# Altium PCB MainBoardPCB.PcbDoc (part 18 of 50)
Units mm, origin at the board's own origin, x right, y up, seen from the top; angles counter-clockwise.
Board outline 258.95 x 308.86 mm, 16 copper layers (L1, L2 (GND), L3 (Sign), L4 (GND), L5 (Sign), L6 (PWR/GND), L7(12V+Other), L8 (Plane_GND), L9 (PWR/GND), L10 (3V3+Other), L11 (PWR/GND), L12 (Sign), L13 (GND), L14 (Sign), L15 (GND), L16), stack 2.503 mm thick; 2578 components, 1867 nets, 8817 pads, 8021 vias.
Unrouted connection lines stored in the file: 25.
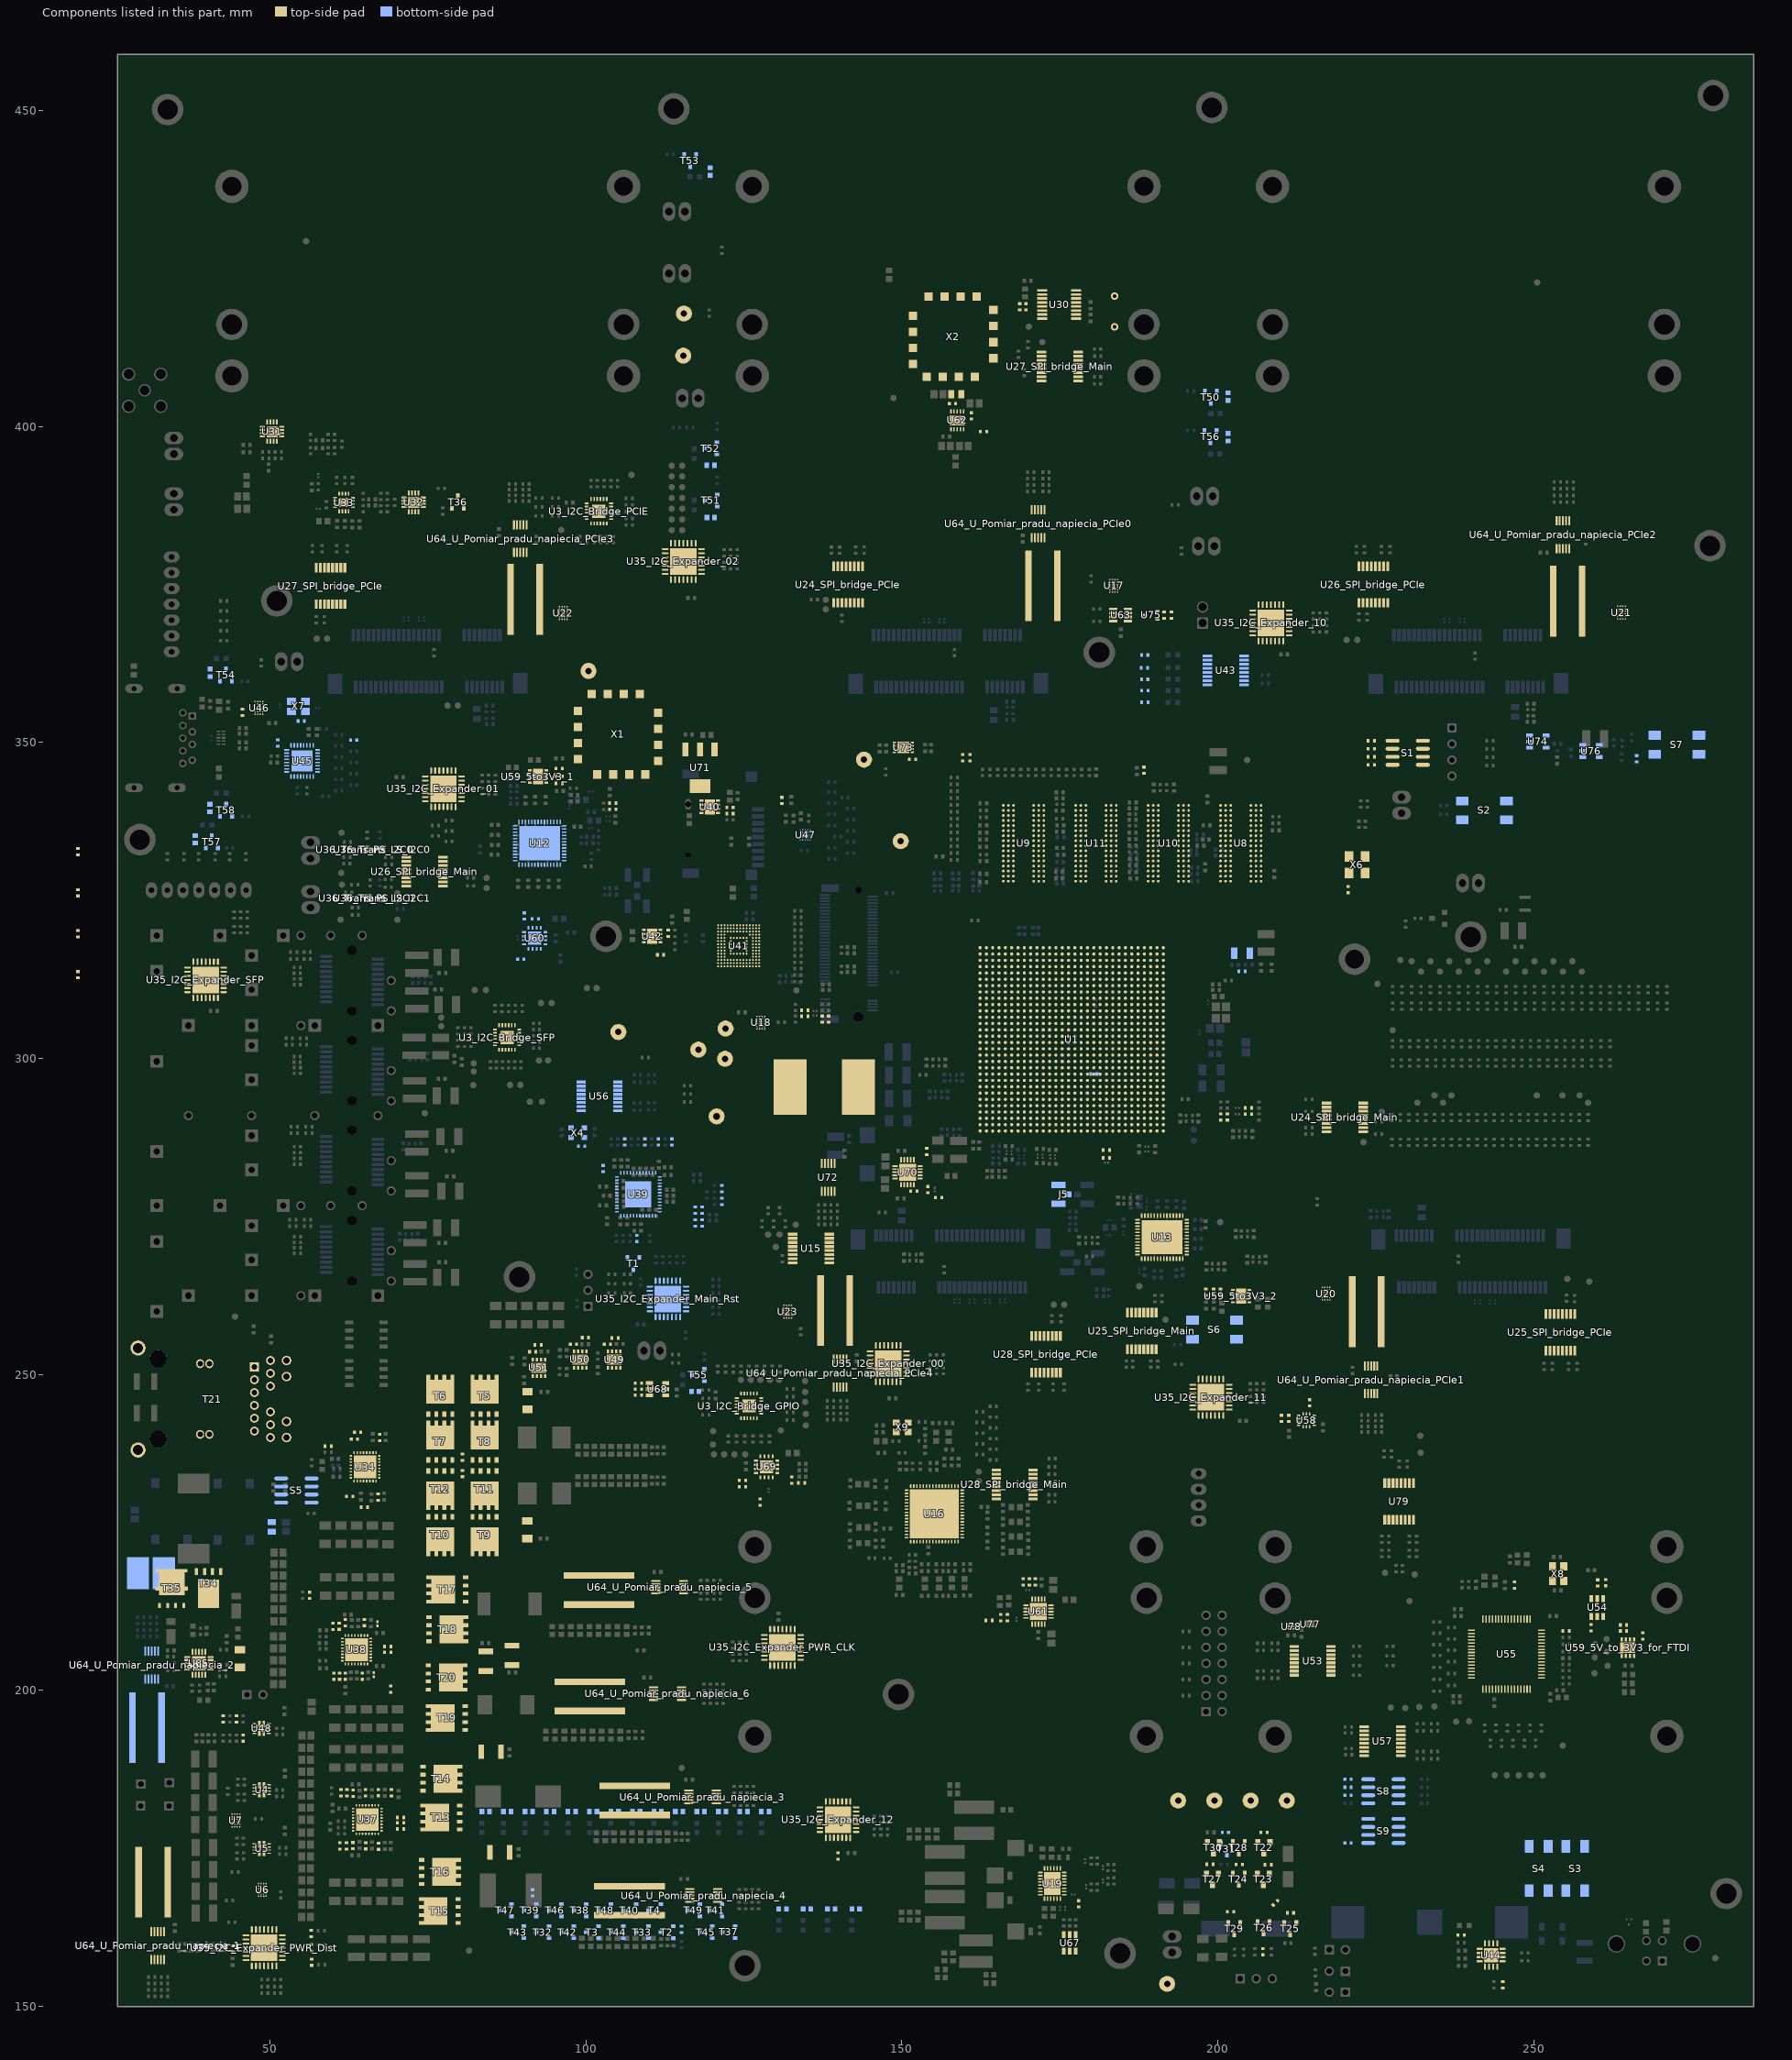
[diagram p23: the components of this part, seen from the top]

## Part data (continued)
R1059 R1089: library part Resistor, Case Code (Imperial)=0402, Case Code (Metric)=1005, Manufacturer=Panasonic, Manufacturer Part Number=ERJ-2RKF2002X, Max Operating Temperature=155°C, Max Power Dissipation=100mW, Min Operating Temperature=-55°C, Package Quantity=1, Supplier Part Number 1=P20.0KLCT-ND, Temperature Coefficient=100ppm/°C, Tolerance=1%, Voltage Rating=50V, Case/Package=0402, ComponentLink1Description=https://datasheet.ciiva.com/11821/0900766b80f80784-11821220.pdf?src-supplier=RSComponents, ComponentLink1URL=https://datasheet.ciiva.com/11821/0900766b80f80784-11821220.pdf?src-supplier=RSComponents, ComponentLink2Description=https://datasheet.ciiva.com/16762/70260748-16762885.pdf?src-supplier=Allied+Electronics, ComponentLink2URL=https://datasheet.ciiva.com/16762/70260748-16762885.pdf?src-supplier=Allied+Electronics, ComponentLink3Description=https://datasheet.ciiva.com/16782/70260748-16782455.pdf?src-supplier=Allied+Electronics, ComponentLink3URL=https://datasheet.ciiva.com/16782/70260748-16782455.pdf?src-supplier=Allied+Electronics, ComponentLink4Description=https://datasheet.ciiva.com/48531/aoa0000ce2-48531063.pdf?src-supplier=Avnet, ComponentLink4URL=https://datasheet.ciiva.com/48531/aoa0000ce2-48531063.pdf?src-supplier=Avnet, ComponentLink5Description=https://datasheet.ciiva.com/28688/1678782-28688600.pdf?src-supplier=Element14, ComponentLink5URL=https://datasheet.ciiva.com/28688/1678782-28688600.pdf?src-supplier=Element14, ComponentLink6Description=https://datasheet.ciiva.com/46377/426256-46377368.pdf?src-supplier=Element14, ComponentLink6URL=https://datasheet.ciiva.com/46377/426256-46377368.pdf?src-supplier=Element14, ComponentLink7Description=https://datasheet.ciiva.com/6138/426256-6138761.pdf?src-supplier=Farnell, ComponentLink7URL=https://datasheet.ciiva.com/6138/426256-6138761.pdf?src-supplier=Farnell, ComponentLink8Description=https://datasheet.ciiva.com/24159/aoa0000ce2-24159274.pdf?src-supplier=Mouser, ComponentLink8URL=https://datasheet.ciiva.com/24159/aoa0000ce2-24159274.pdf?src-supplier=Mouser, ComponentLink9Description=https://datasheet.ciiva.com/16508/aoa0000ce2-16508524.pdf?src-supplier=Future+Electronics, ComponentLink9URL=https://datasheet.ciiva.com/16508/aoa0000ce2-16508524.pdf?src-supplier=Future+Electronics, ComponentLink10Description=https://datasheet.ciiva.com/16514/aoa0000ce2-16514269.pdf?src-supplier=Avnet+Asia, ComponentLink10URL=https://datasheet.ciiva.com/16514/aoa0000ce2-16514269.pdf?src-supplier=Avnet+Asia, ComponentLink11Description=https://datasheet.ciiva.com/30049/aoa0000ce2-30049982.pdf?src-supplier=Onlinecomponents.com, ComponentLink11URL=https://datasheet.ciiva.com/30049/aoa0000ce2-30049982.pdf?src-supplier=Onlinecomponents.com, Composition="Thick Film", Contact Plating=Tin, Depth=0.5mm, Features="Automotive AEC-Q200", Height=0.35mm, Lead Free="Lead Free", Length=1mm, Military Standard=Not, Mount="Surface Mount", Number of Terminations=2, Packaging="Cut Tape", Power Rating=100mW, Pricing 1="1 = 0,10000, 10 = 0,05000, 100 = 0,02050, 1000 = 0,00920, 2500 = 0,00798, 5000 = 0,00660 (USD)", Radiation Hardening=No, REACH SVHC="No SVHC", Resistance=20kR, RoHS=Yes, Stock 1=2516725, Supplier 1=Digi-Key, Termination=SMD/SMT, Voltage Rating (DC)=50V, Weight=2.8E-05oz, Width=0.02inch
S1 S5 S8 S9: library part "SW DIP-4", Current Rating=25mA, Manufacturer=CTS, Manufacturer Part Number=218-4LPSTR, Max Operating Temperature=85°C, Max Voltage Rating (DC)=24V, Min Operating Temperature=-55°C, Package Quantity=2000, Supplier Part Number 1=CT3110CT-ND, Actuator Type="Slide (Standard)", Category="DIP Switches", Code_IPC=SOIC127P600-8, Code_JEDEC=MS-012-AA, ComponentLink1Description=https://datasheet.ciiva.com/8676/218-8676896.pdf?src-supplier=Avnet, ComponentLink1URL=https://datasheet.ciiva.com/8676/218-8676896.pdf?src-supplier=Avnet, ComponentLink2Description=https://datasheet.ciiva.com/8082/218-8082342.pdf?src-supplier=Avnet, ComponentLink2URL=https://datasheet.ciiva.com/8082/218-8082342.pdf?src-supplier=Avnet, ComponentLink3Description=https://datasheet.ciiva.com/16303/218-16303941.pdf?src-supplier=Future+Electronics, ComponentLink3URL=https://datasheet.ciiva.com/16303/218-16303941.pdf?src-supplier=Future+Electronics, ComponentLink4Description=https://datasheet.ciiva.com/15184/getdatasheetpartid-141001-15184860.pdf?src-supplier=Verical, ComponentLink4URL=https://datasheet.ciiva.com/15184/getdatasheetpartid-141001-15184860.pdf?src-supplier=Verical, Contact Material=Copper, Contact Plating=Gold, Depth=8.44mm, Electrical Life=1000Cycles, LatestRevisionDate=29-May-2009, LatestRevisionNote="IPC-7351 Footprint Added.", Lead Free="Lead Free", Length=0.246inch, Max Current Rating=25mA, Mechanical Life=1000Cycles, Mount="Surface Mount", Number of Positions=4, Orientation=Straight, PackageDescription="8-Pin Small Outline Integrated Circuit 1.27 mm Pitch", PackageReference=SO8, PackageVersion=Dec-2002, Packaging="Tape and Reel", Pitch=0.05inch, Pricing 1="1=1,33000, 10=1,28000, 25=1,20280, 100=1,03910, 250=0,94696, 500=0,88040, 1000=0,81898 (USD)", Published=24-Mar-1999, Publisher="Altium Limited", Radiation Hardening=No, RoHS=Yes, Stock 1=21553, Supplier 1=Digi-Key, Termination="Gull Wing", Throw Configuration=SPST, Voltage Rating (DC)=24V, Washable=Yes
S2 S3 S4 S6 S7: "WS-TASV SMT Tact Switch 4.5x4.5mm, height 3.8mm, 160gf", Operating Temperature="-40 to +85degC", Rated Current=50mA, Rated Voltage=12VDC, ComponentLink1Description=Manufacturer, ComponentLink1URL=http://www.we-online.de, ComponentLink2Description=Datasheet, ComponentLink2URL=https://katalog.we-online.com/em/datasheet/430181038816.pdf, Contact Material="Stainless Steel", Contact Plating=Silver, Height=3.8mm, Mounting Technology=SMT, Operation Force=160gf, Packaging="Tape and Reel", Part Number=430181038816, Published Date="September 2019", Publisher="Wurth Elektronik", Terminal Material="Copper Alloy", Terminal Plating=Silver, Washable=No
T1 T2 T3 T4 T24 T25 T26 T28 T29 T31 T32 T33 T36 T37 T38 T39 T40 T41 T42 T43 T44 T45 T46 T47 T48 T49 T50 T51 T52 T53 T54 T55 T56 T57 T58: "Trans MOSFET N-CH 8V 6A 3-Pin SOT-23 T/R", Case/Package=SOT-23, Continuous Drain Current (ID)=6A, Drain to Source Voltage (Vdss)=8V, Gate to Source Voltage (Vgs)=5V, Input Capacitance=1.07nF, Manufacturer=Vishay, Max Operating Temperature=150°C, Max Power Dissipation=2.5W, Min Operating Temperature=-55°C, Package Quantity=3000, Power Dissipation=1.3W, Supplier Part Number 1=SI2342DS-T1-GE3CT-ND, Threshold Voltage=800mV, Category=MOSFETs, ComponentLink1Description=https://datasheet.ciiva.com/14905/si2342ds-14905257.pdf?src-supplier=Arrow, ComponentLink1URL=https://datasheet.ciiva.com/14905/si2342ds-14905257.pdf?src-supplier=Arrow, ComponentLink2Description=https://datasheet.ciiva.com/29746/si2342ds-29746581.pdf?src-supplier=Digi-Key, ComponentLink2URL=https://datasheet.ciiva.com/29746/si2342ds-29746581.pdf?src-supplier=Digi-Key, ComponentLink3Description=https://datasheet.ciiva.com/30021/si2342ds-30021814.pdf?src-supplier=Avnet, ComponentLink3URL=https://datasheet.ciiva.com/30021/si2342ds-30021814.pdf?src-supplier=Avnet, Contact Plating=Tin,Matte, Fall Time=25ns, Lead Free="Lead Free", Manufacturer Part Number=SI2342DS-T1-GE3, Mount="Surface Mount", Number of Elements=1, Number of Pins=3, Packaging="Tape and Reel", Pricing 1="1=0,50000, 10=0,42500, 25=0,39640, 100=0,29460, 250=0,27984, 500=0,23000, 1000=0,18695 (USD)", Radiation Hardening=No, Rds On Max=17mR, REACH SVHC="No SVHC", Rise Time=14ns, RoHS=Yes, Stock 1=25972, Supplier 1=Digi-Key, Turn-Off Delay Time=65ns, Turn-On Delay Time=6ns
T5 T6 T9 T10 T13 T15 T17 T19: "MOSFET N-CH 30V 53A TDSON-8", Continuous Drain Current (ID)=53A, Drain to Source Breakdown Voltage=30V, Drain to Source Resistance=8mR, Gate to Source Voltage (Vgs)=20V, Input Capacitance=1.7nF, Manufacturer 1=Infineon, Max Operating Temperature=150°C, Max Power Dissipation=35W, Min Operating Temperature=-55°C, Package Quantity=1, Power Dissipation=2.5W, Supplier Part Number 1=BSC080N03LSGATMA1CT-ND, Threshold Voltage=2.2V, ComponentLink1Description=https://datasheet.ciiva.com/1189/infineon-bsc080n03ls-ds-v02-01-en-1189645.pdf?src-supplier=Element14, ComponentLink1URL=https://datasheet.ciiva.com/1189/infineon-bsc080n03ls-ds-v02-01-en-1189645.pdf?src-supplier=Element14, ComponentLink2Description=https://datasheet.ciiva.com/26789/bsc080n03ls-g-26789476.pdf?src-supplier=IIIC, ComponentLink2URL=https://datasheet.ciiva.com/26789/bsc080n03ls-g-26789476.pdf?src-supplier=IIIC, Drain to Source Voltage (Vdss)=30V, Element Configuration=Single, Fall Time=2.6ns, Halogen Free="Halogen Free", Height=1.1mm, Length=6.35mm, Manufacturer Part Number 1=BSC080N03LSG, Number of Pins=8, Packaging="Tape and Reel", Pricing 1="1=0,70000, 10=0,61600, 100=0,42020, 500=0,35108, 1000=0,29878 (USD)", Rds On Max=8mR, REACH SVHC="No SVHC", Rise Time=2.8ns, RoHS=Yes, Stock 1=16105, Supplier 1=Digi-Key, Turn-Off Delay Time=15ns, Turn-On Delay Time=3.3ns, Width=5.35mm
T7 T8 T11 T12 T14 T16 T18 T20: "MOSFET, N CH, 100A, 30V, PG-TDSON-8", Case/Package=TO-252-3, Continuous Drain Current (ID)=100A, Drain to Source Breakdown Voltage=30V, Drain to Source Resistance=4.7mR, Gate to Source Voltage (Vgs)=20V, Input Capacitance=4.3nF, Manufacturer 1=Infineon, Max Operating Temperature=150°C, Max Power Dissipation=69W, Min Operating Temperature=-55°C, Package Quantity=5000, Power Dissipation=2.5W, Supplier Part Number 1="BSC030N03LS G-ND", Threshold Voltage=1V, ComponentLink1Description=https://datasheet.ciiva.com/26896/getdatasheetpartid-635090-26896521.pdf?src-supplier=Verical, ComponentLink1URL=https://datasheet.ciiva.com/26896/getdatasheetpartid-635090-26896521.pdf?src-supplier=Verical, ComponentLink2Description=https://datasheet.ciiva.com/26790/bsc030n03ls-g-26790009.pdf?src-supplier=IIIC, ComponentLink2URL=https://datasheet.ciiva.com/26790/bsc030n03ls-g-26790009.pdf?src-supplier=IIIC, ComponentLink3Description=https://datasheet.ciiva.com/6368/bsc030n03ls-rev1-27-6368951.pdf?src-supplier=Digi-Key, ComponentLink3URL=https://datasheet.ciiva.com/6368/bsc030n03ls-rev1-27-6368951.pdf?src-supplier=Digi-Key, ComponentLink4Description=https://datasheet.ciiva.com/6368/bsc030n03ls-rev1-27-6368952.pdf?src-supplier=Digi-Key, ComponentLink4URL=https://datasheet.ciiva.com/6368/bsc030n03ls-rev1-27-6368952.pdf?src-supplier=Digi-Key, ComponentLink5Description=https://datasheet.ciiva.com/11172/bsc030n03ls-rev1-27-11172568.pdf?src-supplier=Avnet, ComponentLink5URL=https://datasheet.ciiva.com/11172/bsc030n03ls-rev1-27-11172568.pdf?src-supplier=Avnet, ComponentLink6Description=https://datasheet.ciiva.com/11172/bsc030n03ls-rev1-27-11172569.pdf?src-supplier=Avnet, ComponentLink6URL=https://datasheet.ciiva.com/11172/bsc030n03ls-rev1-27-11172569.pdf?src-supplier=Avnet, ComponentLink7Description=https://datasheet.ciiva.com/6368/bsc030n03ls-rev1-27-6368954.pdf?src-supplier=Digi-Key, ComponentLink7URL=https://datasheet.ciiva.com/6368/bsc030n03ls-rev1-27-6368954.pdf?src-supplier=Digi-Key, Contact Plating=Tin, Element Configuration=Single, Fall Time=4.8ns, Halogen Free="Halogen Free", Height=1.1mm, Lead Free="Lead Free", Length=5.35mm, Manufacturer Part Number 1=BSC030N03LS-G, Number of Elements=1, Number of Pins=8, Packaging="Tape and Reel", Radiation Hardening=No, Rds On Max=3mR, REACH SVHC="No SVHC", Rise Time=5.2ns, RoHS=Yes, Stock 1=0, Supplier 1=Digi-Key, Turn-Off Delay Time=29ns, Turn-On Delay Time=7.3ns, Width=6.35mm
T21: "WE-RJ45 LAN Transformer, THT, 10/100/1000 Base-T, Port 1x1, Tab Up", Operating Temperature="-40 to +85degC", ComponentLink1Description=Manufacturer, ComponentLink1URL=http://www.we-online.de, ComponentLink2Description=Datasheet, ComponentLink2URL=https://katalog.we-online.com/pbs/datasheet/7499511440.pdf, Data Rate="10/100/1000 Base-T", LED=green/yellow-green/yellow, Mounting Technology=THT, Packaging=Tray, Part Number=7499511440, PoE="PoE+ (up to 600 mA)", Port Number=1x1, Published Date="July 2019", Publisher="Wurth Elektronik", Shield Tabs=Yes, Tab=Up, USB=No
T22 T23 T27 T30: "MOSFET MOSFT P-Ch -4.3A 50mOhm 10nC Log Lvl", Case/Package=SOT-23, Continuous Drain Current (ID)=4.3A, Current Rating=-4.3A, Drain to Source Breakdown Voltage=-12V, Drain to Source Resistance=50mR, Drain to Source Voltage (Vdss)=12V, Gate to Source Voltage (Vgs)=8V, Input Capacitance=830pF, Manufacturer="International Rectifier", Max Operating Temperature=150°C, Max Power Dissipation=1.3W, Min Operating Temperature=-55°C, Package Quantity=1, Supplier Part Number 1=IRLML6401PBFCT-ND, Threshold Voltage=-550mV, Category=MOSFETs, ComponentLink1Description=https://datasheet.ciiva.com/6131/irlml6401-6131072.pdf?src-supplier=Farnell, ComponentLink1URL=https://datasheet.ciiva.com/6131/irlml6401-6131072.pdf?src-supplier=Farnell, ComponentLink2Description=https://datasheet.ciiva.com/6383/irlml6401pbf-6383328.pdf?src-supplier=Digi-Key, ComponentLink2URL=https://datasheet.ciiva.com/6383/irlml6401pbf-6383328.pdf?src-supplier=Digi-Key, ComponentLink3Description=https://datasheet.ciiva.com/34302/1563711-34302499.pdf?src-supplier=Jameco, ComponentLink3URL=https://datasheet.ciiva.com/34302/1563711-34302499.pdf?src-supplier=Jameco, ComponentLink4Description=https://datasheet.ciiva.com/6383/irlml6401pbf-6383326.pdf?src-supplier=Digi-Key, ComponentLink4URL=https://datasheet.ciiva.com/6383/irlml6401pbf-6383326.pdf?src-supplier=Digi-Key, Dual Supply Voltage=-12V, Element Configuration=Single, Fall Time=210ns, Height=1.02mm, Lead Free="Lead Free", Length=3.04mm, Manufacturer Part Number=IRLML6401TRPBF, Mount="Surface Mount", Nominal Vgs=-550mV, Number of Elements=1, Number of Pins=3, On-State Resistance=50mR, Packaging="Tape and Reel", Power Dissipation=1.3W, Pricing 1="1=0,37000, 10=0,30300, 25=0,27680, 100=0,17380, 250=0,17188, 500=0,16096, 1000=0,10945 (USD)", Radiation Hardening=No, Rds On Max=50mR, REACH SVHC="No SVHC", Rise Time=32ns, RoHS=Yes, Stock 1=90278, Supplier 1=Digi-Key, Termination=SMD/SMT, Turn-Off Delay Time=250ns, Turn-On Delay Time=11ns, Voltage Rating (DC)=-12V, Width=1.4mm
T34: "MOSFET N-CH 60V 25A LFPAK", Continuous Drain Current (ID)=25A, Drain to Source Resistance=14MR, Drain to Source Voltage (Vdss)=60V, Gate to Source Voltage (Vgs)=20V, Input Capacitance=2.03nF, Manufacturer=Renesas, Max Operating Temperature=150°C, Max Power Dissipation=45W, Min Operating Temperature=-55°C, Package Quantity=1, Supplier Part Number 1=968-RJK0651DPB-00#J5, Category=MOSFETs, ComponentLink1Description=https://datasheet.ciiva.com/16481/r07ds0076ej0200-rjk0651dpb-16481749.pdf?src-supplier=Future+Electronics, ComponentLink1URL=https://datasheet.ciiva.com/16481/r07ds0076ej0200-rjk0651dpb-16481749.pdf?src-supplier=Future+Electronics, Fall Time=6.8ns, Lead Free="Lead Free", Manufacturer Part Number=RJK0651DPB-00#J5, Mount="Surface Mount", Number of Elements=1, Number of Pins=5, Packaging="Tape and Reel", Power Dissipation=45W, Pricing 1="1=1,29000, 10=1,15000, 25=1,11000, 100=0,90000, 250=0,85900, 500=0,73200 (USD)", Radiation Hardening=No, Rds On Max=14mR, Rise Time=4.4ns, RoHS=Yes, Stock 1=1853, Supplier 1=Mouser, Turn-Off Delay Time=42ns, Turn-On Delay Time=8.4ns
T35: "MOSFET 80V 6.2mOhm@10V 60A N-Ch MV T-FET", Continuous Drain Current (ID)=60A, Drain to Source Breakdown Voltage=80V, Drain to Source Resistance=6.2mR, Gate to Source Voltage (Vgs)=20V, Input Capacitance=2.425nF, Manufacturer=Vishay, Max Operating Temperature=150°C, Max Power Dissipation=69.4W, Min Operating Temperature=-55°C, On-State Resistance=9.5MR, Package Quantity=1, Supplier Part Number 1=SIJ482DP-T1-GE3CT-ND, Threshold Voltage=1.5V, Category=MOSFETs, ComponentLink1Description=https://datasheet.ciiva.com/30021/sij482dp-30021697.pdf?src-supplier=Avnet, ComponentLink1URL=https://datasheet.ciiva.com/30021/sij482dp-30021697.pdf?src-supplier=Avnet, ComponentLink2Description=https://datasheet.ciiva.com/4438/sij482dp-104025-4438550.pdf?src-supplier=Mouser, ComponentLink2URL=https://datasheet.ciiva.com/4438/sij482dp-104025-4438550.pdf?src-supplier=Mouser, ComponentLink3Description=https://datasheet.ciiva.com/16486/sij482dp-16486587.pdf?src-supplier=Future+Electronics, ComponentLink3URL=https://datasheet.ciiva.com/16486/sij482dp-16486587.pdf?src-supplier=Future+Electronics, ComponentLink4Description=https://datasheet.ciiva.com/6369/sij482dp-6369549.pdf?src-supplier=Digi-Key, ComponentLink4URL=https://datasheet.ciiva.com/6369/sij482dp-6369549.pdf?src-supplier=Digi-Key, Drain to Source Voltage (Vdss)=80V, Element Configuration=Single, Height=1.14mm, Lead Free="Lead Free", Length=5mm, Manufacturer Part Number=SIJ482DP-T1-GE3, Mount="Through Hole,Surface Mount", Number of Elements=1, Number of Pins=5, Packaging="Tape and Reel", Power Dissipation=69.4W, Pricing 1="1=1,76000, 10=1,58300, 25=1,49360, 100=1,16490, 250=1,13508, 500=0,98572, 1000=0,83636 (USD)", Radiation Hardening=No, Rds On Max=6.2mR, REACH SVHC=Unknown, RoHS=Yes, Stock 1=1756, Supplier 1=Digi-Key, Turn-Off Delay Time=72ns, Turn-On Delay Time=28ns, Width=4.47mm
TP19 TP20 TP21 TP22 TP23 TP25 TP27 TP29 TP31 TP32 TP34 TP35 TP36 TP38 TP42: "TEstPoint", Color=Black, Flammability Rating="UL94 V-0", Manufacturer="Keystone Electronics", Manufacturer Part Number=5001, Package Quantity=100, Supplier Part Number 1=36-5001-ND, Body Material=PBT,Bronze, ComponentLink1Description=https://datasheet.ciiva.com/27052/1581986-27052611.pdf?src-supplier=Jameco, ComponentLink1URL=https://datasheet.ciiva.com/27052/1581986-27052611.pdf?src-supplier=Jameco, ComponentLink2Description=https://datasheet.ciiva.com/11836/0900766b8009b7c7-11836045.pdf?src-supplier=RSComponents, ComponentLink2URL=https://datasheet.ciiva.com/11836/0900766b8009b7c7-11836045.pdf?src-supplier=RSComponents, ComponentLink3Description=https://datasheet.ciiva.com/22631/1703983-22631100.pdf?src-supplier=Element14, ComponentLink3URL=https://datasheet.ciiva.com/22631/1703983-22631100.pdf?src-supplier=Element14, ComponentLink4Description=https://datasheet.ciiva.com/16318/m60-2p60-16318423.pdf?src-supplier=Future+Electronics, ComponentLink4URL=https://datasheet.ciiva.com/16318/m60-2p60-16318423.pdf?src-supplier=Future+Electronics, Contact Material=Bronze, Contact Plating=Silver,Tin, Diameter=2.54mm, Height=0.3inch, Hole Diameter=1.6mm, Housing Color=Black, Inside Diameter=1.27mm, Insulation=Insulated, Lead Free="Lead Free", Length=7.62mm, Material=Nylon,Bronze,Silver, Mount="Through Hole,PCB", Number of Contacts=1, Number of Ports=1, Orientation=Straight, Outside Diameter=2.54mm, Packaging=Bulk, Plating=Silver, Pricing 1="1 = 0,35000, 10 = 0,33500, 25 = 0,30800, 100 = 0,30150, 250 = 0,28304, 500 = 0,25230, 1000 = 0,17140, 2500 = 0,15296, 5000 = 0,14340 (USD)", REACH SVHC="No SVHC", RoHS=Yes, Stock 1=352180, Supplier 1=Digi-Key, Termination="Through Hole"
U1: "FPGA Zynq UltraScale+ Family 192150 Cells 20nm Technology 0.85V 900-Pin FCBGA Tray", Case/Package=FCBGA, Frequency=500MHz, Manufacturer=Xilinx, Manufacturer Part Number=XCZU4CG-1FBVB900E, Max Operating Temperature=100°C, Min Operating Temperature=0°C, Supplier Part Number 1=217-CZU4CG-1FBVB900E, ComponentLink1Description=https://www.xilinx.com/support/documentation/data_sheets/ds891-zynq-ultrascale-plus-overview.pdf?src-supplier=Digi-Key, ComponentLink1URL=https://www.xilinx.com/support/documentation/data_sheets/ds891-zynq-ultrascale-plus-overview.pdf?src-supplier=Digi-Key, ComponentLink2Description=https://www.xilinx.com/support/documentation/data_sheets/ds925-zynq-ultrascale-plus.pdf?src-supplier=Digi-Key, ComponentLink2URL=https://www.xilinx.com/support/documentation/data_sheets/ds925-zynq-ultrascale-plus.pdf?src-supplier=Digi-Key, Core Architecture=ARM, Interface=I2C,SPI,USB,Ethernet,MMC,SDIO,SD,UART,USART,EBI/EMI, Number of I/Os=204, Packaging=Tray, Peripherals=WDT,DMA, Pricing 1="1=0,00000, 5=1060,70000 (USD)", RAM Size=256KB, RoHS=No, Stock 1=3, Supplier 1=Mouser, Supplier 2=Avnet, Supplier 3=Digi-Key, Supplier Part Number 2=XCZU4CG-1FBVB900E, Supplier Part Number 3=XCZU4CG-1FBVB900E-ND
U3_I2C_Bridge_GPIO U3_I2C_Bridge_PCIE U3_I2C_Bridge_SFP: "8X I2C Switch", Case/Package=VQFN, Manufacturer="Texas Instruments", Manufacturer Part Number=TCA9548ARGER, Max Operating Temperature=85°C, Max Supply Current=80uA, Max Supply Voltage=5.5V, Min Operating Temperature=-40°C, Min Supply Voltage=1.65V, On-State Resistance=70R, Package Quantity=3000, Supplier Part Number 1=296-39222-1-ND, ComponentLink1Description=https://datasheet.ciiva.com/30010/tca9548a-30010277.pdf?src-supplier=Avnet, ComponentLink1URL=https://datasheet.ciiva.com/30010/tca9548a-30010277.pdf?src-supplier=Avnet, ComponentLink2Description=https://datasheet.ciiva.com/29616/tca9548a-29616682.pdf?src-supplier=Digi-Key, ComponentLink2URL=https://datasheet.ciiva.com/29616/tca9548a-29616682.pdf?src-supplier=Digi-Key, Independent Circuits=1, Lead Free="Lead Free", Mount="Surface Mount", Number of Pins=24, Packaging="Tape and Reel", Pricing 1="1 = 1,55000, 10 = 1,39200, 100 = 1,11890, 500 = 0,91928, 1000 = 0,76169 (USD)", Propagation Delay=1ns, Radiation Hardening=No, REACH SVHC="No SVHC", RoHS=Yes, Stock 1=1611, Supplier 1=Digi-Key, Supply Type=Single, Weight=0.001926oz
U4 U5 U48: Manufacturer 1="Texas Instruments", Supplier Part Number 1=296-53412-1-ND, Manufacturer Part Number 1=TPS2121RUXT, Pricing 1="1=2,46000, 10=2,21100, 100=1,66860 (USD)", RoHS=No, Stock 1=67, Supplier 1=Digi-Key
  U5: ComponentLink1Description=Datasheet, ComponentLink1URL=http://www.ti.com/lit/ds/symlink/tps2120.pdf
U6 U7 U17 U18 U20 U21 U22 U23 U46: "Current Limit Load Switch with OVP and TRCB, 28 V, 5 A", Manufacturer 1="ON Semiconductor", Supplier Part Number 1=863-FPF2895CUCX, Manufacturer Part Number 1=FPF2895CUCX, Pricing 1="1=2,18000, 10=1,85000, 100=1,48000, 500=1,29000, 1000=1,07000, 3000=1,00000, 6000=0,96500, 9000=0,92800, 24000=0,89200 (USD)", RoHS=No, Stock 1=808, Supplier 1=Mouser
U8 U9 U10 U11: "RAM 8GB", Frequency=1.2GHz, Manufacturer="Micron Technology", Manufacturer Part Number=MT40A512M16JY-083EIT:BTR, Max Operating Temperature=95°C, Min Operating Temperature=-40°C, Supplier Part Number 1=557-1690-2-ND, ComponentLink1Description=https://www.micron.com/~/media/documents/products/data-sheet/dram/ddr4/8gb_ddr4_sdram.pdf?src-supplier=Digi-Key, ComponentLink1URL=https://www.micron.com/~/media/documents/products/data-sheet/dram/ddr4/8gb_ddr4_sdram.pdf?src-supplier=Digi-Key, Interface=Parallel, Memory Type=RAM,SDRAM, Pricing 1="2000 = 12,80254 (USD)", RoHS=Yes, Stock 1=0, Supplier 1=Digi-Key
U12 U13: "Dystrybutor Zegarów", Manufacturer="Analog Devices", Manufacturer Part Number=LTC6952IUKG#PBF, Supplier Part Number 1=LTC6952IUKG#PBF-ND, Number of Pins=52, Pricing 1="1 = 30,78000, 25 = 24,62680, 100 = 21,36000, 250 = 20,50564, 500 = 19,86492 (USD)", RoHS=No, Stock 1=267, Supplier 1=Digi-Key
U15 U24_SPI_bridge_Main U24_SPI_bridge_PCIe U25_SPI_bridge_Main U25_SPI_bridge_PCIe U26_SPI_bridge_Main U26_SPI_bridge_PCIe U27_SPI_bridge_Main U27_SPI_bridge_PCIe U28_SPI_bridge_Main U28_SPI_bridge_PCIe U43 U53 U56 U57 U79: Manufacturer 1="Texas Instruments", Supplier Part Number 1=296-SN74AXC4T774PWRCT-ND, Manufacturer Part Number 1=SN74AXC4T774PWR, Pricing 1="1=1,14000, 10=1,01500, 100=0,79120, 500=0,65364, 1000=0,51603 (USD)", RoHS=No, Stock 1=2000, Supplier 1=Digi-Key
U16: Manufacturer="Texas Instruments", Manufacturer Part Number=LMK05028RGCR, Supplier Part Number 1=296-49099-1-ND, ComponentLink1Description=http://www.ti.com/lit/ds/symlink/lmk05028.pdf?src-supplier=Digi-Key, ComponentLink1URL=http://www.ti.com/lit/ds/symlink/lmk05028.pdf?src-supplier=Digi-Key, Number of Inputs=4, Number of Outputs=8, Pricing 1="1 = 32,36000, 10 = 29,84800, 100 = 25,48800 (USD)", RoHS=No, Stock 1=230, Supplier 1=Digi-Key, Supplier 2=Digi-Key, Supplier 3=Mouser, Supplier Part Number 2=296-49099-6-ND, Supplier Part Number 3=595-LMK05028RGCT
U19: "Quad 40 V / 1 A Step-Down Switching Regulator with 100% Duty Cycle Operation, 28-pin QFN (UFD-28), -40 to 125 degC, Pb-Free", Manufacturer="Linear Technology", Supplier Part Number 1=LT3504EUFD#PBF-ND, Code_JEDEC=MO-220, ComponentLink1Description="Manufacturer URL", ComponentLink1URL=http://www.linear.com/, ComponentLink2Description=Datasheet, ComponentLink2URL=http://cds.linear.com/docs/en/datasheet/3504fa.pdf, ComponentLink3Description="Package Specification", ComponentLink3URL=http://cds.linear.com/docs/en/packaging/QFN_28_05-08-1712.pdf, Mounting Technology="Surface Mount", Number of Outputs=4, PackageDescription="28-Pin Plastic QFN, Body 5 x 4 mm, Pitch 0.5 mm", PackageReference=UFD-28, PackageVersion="Rev. B, 06/2010", PartNumber=LT3504EUFD#PBF, RoHS=TRUE, Supplier 1=Digi-Key, Supplier 2=Farnell, Supplier 3=Newark, Supplier Part Number 2=2215129, Supplier Part Number 3=27W9523
U30: "DAC 20bit", Case/Package=SSOP, Manufacturer="Texas Instruments", Manufacturer Part Number=DAC1220E, Max Operating Temperature=85°C, Max Supply Voltage=5.25V, Min Operating Temperature=-40°C, Min Supply Voltage=4.75V, Nominal Supply Current=460uA, Operating Supply Voltage=5V, Package Quantity=75, Power Consumption=2.5mW, Supplier Part Number 1=DAC1220E-ND, ComponentLink1Description=https://datasheet.ciiva.com/1494/1762528-1494337.pdf?src-supplier=Element14, ComponentLink1URL=https://datasheet.ciiva.com/1494/1762528-1494337.pdf?src-supplier=Element14, ComponentLink2Description=https://datasheet.ciiva.com/25983/sbas082g-25983810.pdf?src-supplier=Avnet+Europe, ComponentLink2URL=https://datasheet.ciiva.com/25983/sbas082g-25983810.pdf?src-supplier=Avnet+Europe, ComponentLink3Description=https://datasheet.ciiva.com/14152/uz642298-e-14152445.pdf?src-supplier=Distrelec, ComponentLink3URL=https://datasheet.ciiva.com/14152/uz642298-e-14152445.pdf?src-supplier=Distrelec, ComponentLink4Description=https://datasheet.ciiva.com/26804/dac1220e-26804784.pdf?src-supplier=IIIC, ComponentLink4URL=https://datasheet.ciiva.com/26804/dac1220e-26804784.pdf?src-supplier=IIIC, ComponentLink5Description=https://datasheet.ciiva.com/15146/getdatasheetpartid-224186-15146981.pdf?src-supplier=Verical, ComponentLink5URL=https://datasheet.ciiva.com/15146/getdatasheetpartid-224186-15146981.pdf?src-supplier=Verical, ComponentLink6Description=https://datasheet.ciiva.com/3040/sbas082g-3040444.pdf?src-supplier=Avnet, ComponentLink6URL=https://datasheet.ciiva.com/3040/sbas082g-3040444.pdf?src-supplier=Avnet, ComponentLink7Description=https://datasheet.ciiva.com/1364/dac1220-1364430.pdf?src-supplier=Digi-Key, ComponentLink7URL=https://datasheet.ciiva.com/1364/dac1220-1364430.pdf?src-supplier=Digi-Key, Contact Plating=Gold, Conversion Rate=500S/s, Differential Nonlinearity=1LSB, Full Scale Error=10LSB, Height=1.5mm, Integral Nonlinearity (INL)=1LSB, Interface=SPI, Lead Free="Lead Free", Length=5mm, Number of Bits=20, Number of Channels=1, Number of Converters=1, Number of DAC Channels=1, Number of Pins=16, Output Type=Voltage, Packaging=Rail/Tube, Polarity=Unipolar, Pricing 1="1 = 19,80000, 10 = 18,19400, 25 = 17,44000, 100 = 15,36600, 500 = 13,66916 (USD)", Radiation Hardening=No, REACH SVHC="No SVHC", Resolution=20b, RoHS=Yes, Sampling Rate=500S/s, Settling Time=2000us, Stock 1=237, Supplier 1=Digi-Key, Supply Type=Analog,Digital, Weight=0.002603oz, Width=4mm
U31 U32: "IC BUFFER 2:4 LVPECL MUX 16QFN", Case/Package=QFN, Frequency=1.25GHz, Manufacturer 1="Silicon Labs", Max Operating Temperature=85°C, Max Supply Voltage=3.63V, Min Operating Temperature=-40°C, Min Supply Voltage=2.38V, Nominal Supply Current=210mA, Package Quantity=100, Supplier Part Number 1=336-2500-5-ND, ComponentLink1Description=https://datasheet.ciiva.com/24019/si53323-258666-24019274.pdf?src-supplier=Mouser, ComponentLink1URL=https://datasheet.ciiva.com/24019/si53323-258666-24019274.pdf?src-supplier=Mouser, ComponentLink2Description=https://datasheet.ciiva.com/30480/0900766b812accf9-30480970.pdf?src-supplier=RSComponents, ComponentLink2URL=https://datasheet.ciiva.com/30480/0900766b812accf9-30480970.pdf?src-supplier=RSComponents, ComponentLink3Description=https://datasheet.ciiva.com/29883/si53323-29883370.pdf?src-supplier=Avnet, ComponentLink3URL=https://datasheet.ciiva.com/29883/si53323-29883370.pdf?src-supplier=Avnet, ComponentLink4Description=https://datasheet.ciiva.com/46413/1813444-46413388.pdf?src-supplier=Element14, ComponentLink4URL=https://datasheet.ciiva.com/46413/1813444-46413388.pdf?src-supplier=Element14, ComponentLink5Description=https://datasheet.ciiva.com/18646/si53323-18646941.pdf?src-supplier=Digi-Key, ComponentLink5URL=https://datasheet.ciiva.com/18646/si53323-18646941.pdf?src-supplier=Digi-Key, Height=0.85mm, Input=LVCMOS, Length=3mm, Logic Function=Clock, Manufacturer Part Number 1=SI53323-B-GM, Max Duty Cycle=54%, Max Frequency=1.25GHz, Mount="Surface Mount", Number of Circuits=1, Number of Outputs=4, Number of Pins=16, Packaging=Rail/Tube, Pricing 1="1=1,76000, 25=1,61120, 100=1,46480, 1000=1,31828 (USD)", Propagation Delay=0.975ns, REACH SVHC=Unknown, RoHS=Yes, Stock 1=40, Supplier 1=Digi-Key, Width=3mm
U33: "IC, BUF LVPECL CLOCK DRVR 16-VQFN", Case/Package=QFN, Frequency=800MHz, Input Current=10uA, Manufacturer="Texas Instruments", Max Operating Temperature=85°C, Max Supply Voltage=3.6V, Min Operating Temperature=-40°C, Min Supply Voltage=3V, Package Quantity=1, Supplier Part Number 1=296-17045-1-ND, Category="Clock Buffers, Drivers", ComponentLink1Description=https://datasheet.ciiva.com/6676/cdcm1802-6676992.pdf?src-supplier=Digi-Key, ComponentLink1URL=https://datasheet.ciiva.com/6676/cdcm1802-6676992.pdf?src-supplier=Digi-Key, ComponentLink2Description=https://datasheet.ciiva.com/1138/1536203-1138821.pdf?src-supplier=Element14, ComponentLink2URL=https://datasheet.ciiva.com/1138/1536203-1138821.pdf?src-supplier=Element14, ComponentLink3Description=https://datasheet.ciiva.com/1141/1772468-1141254.pdf?src-supplier=Farnell, ComponentLink3URL=https://datasheet.ciiva.com/1141/1772468-1141254.pdf?src-supplier=Farnell, ComponentLink4Description=https://datasheet.ciiva.com/14295/cdcm1802-14295382.pdf?src-supplier=Avnet, ComponentLink4URL=https://datasheet.ciiva.com/14295/cdcm1802-14295382.pdf?src-supplier=Avnet, ComponentLink5Description=https://datasheet.ciiva.com/26794/cdcm1802rgtt-26794108.pdf?src-supplier=IIIC, ComponentLink5URL=https://datasheet.ciiva.com/26794/cdcm1802rgtt-26794108.pdf?src-supplier=IIIC, ComponentLink6Description=https://datasheet.ciiva.com/15152/getdatasheetpartid-184104-15152981.pdf?src-supplier=Verical, ComponentLink6URL=https://datasheet.ciiva.com/15152/getdatasheetpartid-184104-15152981.pdf?src-supplier=Verical, ComponentLink7Description=https://datasheet.ciiva.com/1187/cdcm1802-1187191.pdf?src-supplier=Digi-Key, ComponentLink7URL=https://datasheet.ciiva.com/1187/cdcm1802-1187191.pdf?src-supplier=Digi-Key, ComponentLink8Description=https://datasheet.ciiva.com/1187/cdcm1802-1187192.pdf?src-supplier=Digi-Key, ComponentLink8URL=https://datasheet.ciiva.com/1187/cdcm1802-1187192.pdf?src-supplier=Digi-Key, ComponentLink9Description=https://datasheet.ciiva.com/3304/cdcm1802-3304747.pdf?src-supplier=Avnet, ComponentLink9URL=https://datasheet.ciiva.com/3304/cdcm1802-3304747.pdf?src-supplier=Avnet, Contact Plating=Gold, Height=0.9mm, Input=LVTTL, Lead Free="Lead Free", Length=3mm, Logic Function=Buffer,Clock, Manufacturer Part Number=CDCM1802RGTT, Max Frequency=800MHz, Mount="Surface Mount", Nominal Supply Current=10uA, Number of Circuits=1, Number of Outputs=1, Number of Pins=16, Packaging="Tape and Reel", Pricing 1="1=11,18000, 10=10,27700, 25=9,85160, 100=8,67990 (USD)", Propagation Delay=600ps, Radiation Hardening=No, REACH SVHC="No SVHC", RoHS=Yes, Stock 1=774, Supplier 1=Digi-Key, Termination=SMD/SMT, Weight=0.000808oz, Width=3mm
U34 U37 U38: "Analog Devices", Case/Package="LFCSP EP", Max Input Voltage=20V, Max Operating Temperature=85°C, Max Output Current=30A, Min Input Voltage=2.75V, Min Operating Temperature=-40°C, Nominal Supply Current=4.5mA, Operating Supply Current=100uA, Output Current=25A, Output Voltage=18V, Supplier Part Number 1=ADP1850ACPZ-R7CT-ND, Switching Frequency=1.5MHz, Clock Sync=Yes, ComponentLink1Description=https://datasheet.ciiva.com/3217/adp1850-3217744.pdf?src-supplier=Avnet, ComponentLink1URL=https://datasheet.ciiva.com/3217/adp1850-3217744.pdf?src-supplier=Avnet, ComponentLink2Description=https://datasheet.ciiva.com/8306/adp1850-8306183.pdf?src-supplier=Avnet, ComponentLink2URL=https://datasheet.ciiva.com/8306/adp1850-8306183.pdf?src-supplier=Avnet, ComponentLink3Description=https://datasheet.ciiva.com/2015/adp1850-2015067.pdf?src-supplier=Digi-Key, ComponentLink3URL=https://datasheet.ciiva.com/2015/adp1850-2015067.pdf?src-supplier=Digi-Key, ComponentLink4Description=https://datasheet.ciiva.com/17297/adp1850-17297115.pdf?src-supplier=Avnet+Europe, ComponentLink4URL=https://datasheet.ciiva.com/17297/adp1850-17297115.pdf?src-supplier=Avnet+Europe, ComponentLink5Description=https://datasheet.ciiva.com/2015/adp1850-2015068.pdf?src-supplier=Digi-Key, ComponentLink5URL=https://datasheet.ciiva.com/2015/adp1850-2015068.pdf?src-supplier=Digi-Key, ComponentLink6Description=https://datasheet.ciiva.com/2015/adp1850-2015069.pdf?src-supplier=Digi-Key, ComponentLink6URL=https://datasheet.ciiva.com/2015/adp1850-2015069.pdf?src-supplier=Digi-Key, Contact Plating=Tin,Matte, Lead Free="Contains Lead", Manufacturer 1="Analog Devices", Manufacturer Part Number 1=ADP1850ACPZ-R7, Max Duty Cycle=90%, Max Supply Voltage=20V, Min Supply Voltage=2.75V, Number of Output Phases=2, Number of Outputs=2, Number of Pins=32, Output Configuration=Positive, Packaging="Tape and Reel", Pricing 1="1=4,61000, 10=4,14300, 25=3,91640, 100=3,39440, 250=3,22028, 500=2,88956 (USD)", Radiation Hardening=No, REACH SVHC="No SVHC", RoHS=Yes, Stock 1=1022, Supplier 1=Digi-Key, Synchronous Rectifier=Yes
U35_I2C_Expander_00 U35_I2C_Expander_01 U35_I2C_Expander_02 U35_I2C_Expander_10 U35_I2C_Expander_11 U35_I2C_Expander_12 U35_I2C_Expander_Main_Rst U35_I2C_Expander_PWR_CLK U35_I2C_Expander_PWR_Dist U35_I2C_Expander_SFP: "16-Bit I/O Expander with Serial Interface, 28-Pin QFN, Extended Temperature", Manufacturer=Microchip, Supplier Part Number 1=MCP23017-E/ML-ND, Code_JEDEC=MO-220, ComponentLink1Description="Manufacturer URL", ComponentLink1URL=http://www.microchip.com/, ComponentLink2Description=Datasheet, ComponentLink2URL=http://ww1.microchip.com/downloads/en/DeviceDoc/21952b.pdf, ComponentLink3Description="Package Specification", ComponentLink3URL=http://www.microchip.com/stellent/groups/techpub_sg/documents/packagingspec/en012702.pdf, DatasheetVersion="revB, Feb-2007", Mounting Technology="Surface Mount", PackageDescription="28-Lead Plastic Quad Flat, No Lead Package (ML) - 6x6 mm Body [QFN] with 0.55 mm Contact Length", PackageReference=QFN-ML28, PackageVersion="revBB, Aug-2009", PartNumber=MCP23017-E/ML, Supplier 1=Digi-Key, Supplier 2=Newark, Supplier 3=Mouser, Supplier Part Number 2=31K2957, Supplier Part Number 3=579-MCP23017-E/ML
U36_Trans_LS_I2C0 U36_Trans_LS_I2C1 U36_Trans_PS_I2C0 U36_Trans_PS_I2C1: "I2C [V] Level translator", Low Level Output Current=128mA, Manufacturer="Texas Instruments", Manufacturer Part Number=PCA9306DQER, Max Operating Temperature=85°C, Max Supply Voltage=5V, Min Operating Temperature=-40°C, Min Supply Voltage=0uV, Package Quantity=1, Supplier Part Number 1=296-27957-1-ND, ComponentLink1Description=https://datasheet.ciiva.com/1899/pca9306-1899328.pdf?src-supplier=Digi-Key, ComponentLink1URL=https://datasheet.ciiva.com/1899/pca9306-1899328.pdf?src-supplier=Digi-Key, ComponentLink2Description=https://datasheet.ciiva.com/22631/1719693-22631024.pdf?src-supplier=Element14, ComponentLink2URL=https://datasheet.ciiva.com/22631/1719693-22631024.pdf?src-supplier=Element14, ComponentLink3Description=https://datasheet.ciiva.com/15095/getdatasheetpartid-306496-15095555.pdf?src-supplier=Verical, ComponentLink3URL=https://datasheet.ciiva.com/15095/getdatasheetpartid-306496-15095555.pdf?src-supplier=Verical, ComponentLink4Description=https://datasheet.ciiva.com/1504/1862428-1504149.pdf?src-supplier=Element14, ComponentLink4URL=https://datasheet.ciiva.com/1504/1862428-1504149.pdf?src-supplier=Element14, ComponentLink5Description=https://datasheet.ciiva.com/26041/pca9306-26041014.pdf?src-supplier=Avnet+Europe, ComponentLink5URL=https://datasheet.ciiva.com/26041/pca9306-26041014.pdf?src-supplier=Avnet+Europe, ComponentLink6Description=https://datasheet.ciiva.com/14287/pca9306-14287374.pdf?src-supplier=Avnet, ComponentLink6URL=https://datasheet.ciiva.com/14287/pca9306-14287374.pdf?src-supplier=Avnet, ComponentLink7Description=https://datasheet.ciiva.com/1899/pca9306-1899326.pdf?src-supplier=Digi-Key, ComponentLink7URL=https://datasheet.ciiva.com/1899/pca9306-1899326.pdf?src-supplier=Digi-Key, ComponentLink8Description=https://datasheet.ciiva.com/14287/pca9306-14287470.pdf?src-supplier=Avnet, ComponentLink8URL=https://datasheet.ciiva.com/14287/pca9306-14287470.pdf?src-supplier=Avnet, ComponentLink9Description=https://datasheet.ciiva.com/1899/pca9306-1899327.pdf?src-supplier=Digi-Key, ComponentLink9URL=https://datasheet.ciiva.com/1899/pca9306-1899327.pdf?src-supplier=Digi-Key, Height=0.35mm, Lead Free="Lead Free", Length=1.45mm, Logic Function=Translator, Number of Bits=2, Number of Channels=2, Number of Outputs=2, Number of Pins=8, Output Type=I2C, Packaging="Tape and Reel", Pricing 1="1 = 0,67000, 10 = 0,59100, 100 = 0,45340, 500 = 0,35844, 1000 = 0,28675 (USD)", Propagation Delay=0.3ns, Radiation Hardening=No, REACH SVHC="No SVHC", RoHS=Yes, Stock 1=43494, Supplier 1=Digi-Key, Turn-On Delay Time=1.4ns, Width=1.05mm
U39: "IC ETHERNET PHY 48VQFN", Case/Package=VQFN, Manufacturer 1="Texas Instruments", Max Operating Temperature=105°C, Max Supply Voltage=2.625V, Min Operating Temperature=-40°C, Min Supply Voltage=950mV, Supplier Part Number 1=296-43254-1-ND, Cable Length=130m, ComponentLink1Description=http://www.ti.com/general/docs/lit/getliterature.tsp?genericPartNumber=DP83867E&&fileType=pdf&src-supplier=Element14, ComponentLink1URL=http://www.ti.com/general/docs/lit/getliterature.tsp?genericPartNumber=DP83867E&&fileType=pdf&src-supplier=Element14, ComponentLink2Description=http://www.ti.com/lit/ds/symlink/dp83867e.pdf?src-supplier=Avnet, ComponentLink2URL=http://www.ti.com/lit/ds/symlink/dp83867e.pdf?src-supplier=Avnet, ComponentLink3Description=http://www.ti.com/general/docs/lit/getliterature.tsp?genericPartNumber=DP83867E&amp;&amp;fileType=pdf&src-supplier=Farnell, ComponentLink3URL=http://www.ti.com/general/docs/lit/getliterature.tsp?genericPartNumber=DP83867E&amp;&amp;fileType=pdf&src-supplier=Farnell, ComponentLink4Description=http://www.ti.com/lit/ds/symlink/dp83867e.pdf?src-supplier=Digi-Key, ComponentLink4URL=http://www.ti.com/lit/ds/symlink/dp83867e.pdf?src-supplier=Digi-Key, ComponentLink5Description=http://www.ti.com/lit/gpn/dp83867e?src-supplier=Mouser, ComponentLink5URL=http://www.ti.com/lit/gpn/dp83867e?src-supplier=Mouser, Data Rate=1Gbps, Interface=Serial, Lead Free="Lead Free", Manufacturer Part Number 1=DP83867ERGZT, Number of Pins=48, Packaging="Cut Tape", Pricing 1="1=10,84000, 10=9,95900, 25=9,54640, 100=7,99850 (USD)", REACH SVHC="No SVHC", RoHS=Yes, Stock 1=2988, Supplier 1=Digi-Key
U40 U42 U49 U50 U51 U59_5to3V3_1 U59_5to3V3_2 U59_5V_to_3V3_for_FTDI: "IC REG LDO ADJ 1.5A 8DFN", Case/Package=DFN, Dropout Voltage=330mV, Input Bias Current=120uA, Manufacturer 1=Microchip, Max Input Voltage=6V, Max Operating Temperature=125°C, Max Output Current=1.5A, Min Input Voltage=2.3V, Min Operating Temperature=-40°C, Output Voltage=5V, Package Quantity=3300, Reference Voltage=410mV, Supplier Part Number 1=MCP1727T-ADJE/MFCT-ND, Accuracy=0.5%, ComponentLink1Description=https://datasheet.ciiva.com/2057/21999b-2057048.pdf?src-supplier=Digi-Key, ComponentLink1URL=https://datasheet.ciiva.com/2057/21999b-2057048.pdf?src-supplier=Digi-Key, ComponentLink2Description=https://datasheet.ciiva.com/8237/jp027822-8237704.pdf?src-supplier=Avnet, ComponentLink2URL=https://datasheet.ciiva.com/8237/jp027822-8237704.pdf?src-supplier=Avnet, ComponentLink3Description=https://datasheet.ciiva.com/17364/jp027822-17364137.pdf?src-supplier=Avnet+Europe, ComponentLink3URL=https://datasheet.ciiva.com/17364/jp027822-17364137.pdf?src-supplier=Avnet+Europe, Contact Plating=Tin,Matte, Lead Free="Lead Free", Manufacturer Part Number 1=MCP1727T-ADJE/MF, Mount="Surface Mount", Number of Outputs=1, Output Current=1.5A, Output Type=Adjustable, Packaging="Tape and Reel", Polarity=Positive, Pricing 1="1=0.84000, 25=0.71080, 100=0.63860 (USD)", Quiescent Current=120uA, Radiation Hardening=No, RoHS=Yes, Stock 1=9419, Supplier 1=Digi-Key
U41: "IC FLASH 64G MMC", Manufacturer 1="Micron Technology", Supplier Part Number 1=340-296563-REEL, Manufacturer Part Number 1=MTFC8GAKAJCN-4MITTR, Pricing 1="1=17,08000, 10=15,72000, 25=15,39000, 50=15,34000, 100=13,76000, 250=13,34000, 500=12,69000, 1000=11,13000, 2000=10,32000 (USD)", RoHS=No, Stock 1=3395, Supplier 1=Mouser
U44: "IC SUPERVISORY CIRC DL 16TQFN", Manufacturer=Maxim, Max Operating Temperature=125°C, Max Power Dissipation=2W, Max Supply Voltage=28V, Min Operating Temperature=-40°C, Min Supply Voltage=2.2V, Number of Voltages Monitored=2, Operating Supply Current=52uA, Package Quantity=2500, Supplier Part Number 1=MAX16025TE+TCT-ND, Category="Voltage Supervisors", ComponentLink1Description=https://datasheet.ciiva.com/1995/max16025-max16030-1995540.pdf?src-supplier=Digi-Key, ComponentLink1URL=https://datasheet.ciiva.com/1995/max16025-max16030-1995540.pdf?src-supplier=Digi-Key, ComponentLink2Description=https://datasheet.ciiva.com/13028/max16025-max16030-43326-13028393.pdf?src-supplier=Mouser, ComponentLink2URL=https://datasheet.ciiva.com/13028/max16025-max16030-43326-13028393.pdf?src-supplier=Mouser, Lead Free="Lead Free", Manufacturer Part Number=MAX16025TE+T, Mount="Surface Mount", Number of Pins=16, Packaging="Tape and Reel", Pricing 1="1=4,87000, 10=3,85200, 25=3,51240, 100=3,05910, 250=2,83252 (USD)", Reset="Active Low", Reset Timeout=140ms, RoHS=Yes, Stock 1=1731, Supplier 1=Digi-Key, Type=Sequencer, Watchdog Timer=No
U45: "IC TXRX USB 2.0 FLEXPWR 32QFN", Case/Package=QFN, Frequency=60MHz, Manufacturer 1=Microchip, Max Operating Temperature=85°C, Min Operating Temperature=-40°C, Operating Supply Current=18uA, Operating Supply Voltage=5.5V, Package Quantity=4000, Supplier Part Number 1=USB3320C-EZK-DKR-ND, ComponentLink1Description=https://datasheet.ciiva.com/29718/3320-29718762.pdf?src-supplier=Digi-Key, ComponentLink1URL=https://datasheet.ciiva.com/29718/3320-29718762.pdf?src-supplier=Digi-Key, ComponentLink2Description=https://datasheet.ciiva.com/6635/filehandler-aspxddocname-en562261-6635128.pdf?src-supplier=Digi-Key, ComponentLink2URL=https://datasheet.ciiva.com/6635/filehandler-aspxddocname-en562261-6635128.pdf?src-supplier=Digi-Key, ComponentLink3Description=https://datasheet.ciiva.com/29718/filehandler-aspxddocname-en562261-29718763.pdf?src-supplier=Digi-Key, ComponentLink3URL=https://datasheet.ciiva.com/29718/filehandler-aspxddocname-en562261-29718763.pdf?src-supplier=Digi-Key, Data Rate=12Mbps, ESD Protection=Yes, Height=0.95mm, Interface=UART, Lead Free="Lead Free", Length=5.1mm, Manufacturer Part Number 1=USB3320C-EZK-TR, Number of Pins=32, Number of Transceivers=1, Packaging="Tape and Reel", Pricing 1="1=1,55000, 25=1,29000 (USD)", Radiation Hardening=No, Receiver Hysteresis=50mV, RoHS=Yes, Simplex/Duplex="Half Duplex", Stock 1=3750, Supplier 1=Digi-Key, Weight=0.006653oz, Width=5.1mm
U47: "Memory Card Interface 25-WLCSP (2.04x2.04)", Manufacturer 1="Nexperia USA", Supplier Part Number 1=1727-8607-1-ND, ComponentLink1Description=Datasheet, ComponentLink1URL=https://assets.nexperia.com/documents/data-sheet/IP4856CX25_C.pdf, Manufacturer Part Number 1=IP4856CX25/CZ, Pricing 1="1=1,52000, 10=1,36500, 100=1,03000, 500=0,87550, 1000=0,69525 (USD)", RoHS=No, Stock 1=3532, Supplier 1=Digi-Key
U54: "MICROCHIP - 93LC56BT-I/OT. - 2K, 128 X 16, SERIAL EE, IND ROHS COMPLIANT: YES", Case/Package=SOT-23, Frequency=2MHz, Manufacturer=Microchip, Max Operating Temperature=85°C, Max Supply Voltage=5.5V, Min Operating Temperature=-40°C, Min Supply Voltage=2.5V, Nominal Supply Current=2mA, Package Quantity=3000, Supplier Part Number 1=93LC56BT-I/OTCT-ND, Access Time=250ns, Category=EEPROM, ComponentLink1Description=https://datasheet.ciiva.com/48496/jp013939-48496476.pdf?src-supplier=Avnet, ComponentLink1URL=https://datasheet.ciiva.com/48496/jp013939-48496476.pdf?src-supplier=Avnet, ComponentLink2Description=https://datasheet.ciiva.com/16216/filehandler-aspxddocname-en013939-16216574.pdf?src-supplier=Future+Electronics, ComponentLink2URL=https://datasheet.ciiva.com/16216/filehandler-aspxddocname-en013939-16216574.pdf?src-supplier=Future+Electronics, ComponentLink3Description=https://datasheet.ciiva.com/3185/jp013939-3185519.pdf?src-supplier=Avnet, ComponentLink3URL=https://datasheet.ciiva.com/3185/jp013939-3185519.pdf?src-supplier=Avnet, ComponentLink4Description=https://datasheet.ciiva.com/16622/jp013939-16622127.pdf?src-supplier=Avnet+Europe, ComponentLink4URL=https://datasheet.ciiva.com/16622/jp013939-16622127.pdf?src-supplier=Avnet+Europe, Contact Plating=Tin,Matte, Density=2Kb, Height=1.3mm, Interface=Serial, Lead Free="Lead Free", Length=3.1mm, Manufacturer Part Number=93LC56BT-I/OT, Max Frequency=2MHz, Memory Size=2Kb, Memory Type=EEPROM, Mount="Surface Mount", Number of Pins=6, Packaging="Tape and Reel", Pricing 1="1=0,22000, 25=0,21000, 100=0,20630 (USD)", Radiation Hardening=No, REACH SVHC="No SVHC", RoHS=Yes, Stock 1=9343, Supplier 1=Digi-Key, Width=1.8mm
U55: "IC USB HS QUAD UART/SYNC 64-LQFP", Case/Package=LQFP, Dual Supply Voltage=3.3V, Manufacturer 1=FTDI, Max Operating Temperature=85°C, Max Supply Voltage=3.63V, Min Operating Temperature=-40°C, Min Supply Voltage=1.62V, Operating Supply Current=70mA, Package Quantity=1000, Supplier Part Number 1=768-1026-1-ND, ComponentLink1Description=https://datasheet.ciiva.com/26852/getdatasheetpartid-643215-26852858.pdf?src-supplier=Verical, ComponentLink1URL=https://datasheet.ciiva.com/26852/getdatasheetpartid-643215-26852858.pdf?src-supplier=Verical, ComponentLink2Description=https://datasheet.ciiva.com/26841/ft4232hl-reel-26841744.pdf?src-supplier=IIIC, ComponentLink2URL=https://datasheet.ciiva.com/26841/ft4232hl-reel-26841744.pdf?src-supplier=IIIC, ComponentLink3Description=https://datasheet.ciiva.com/48909/70403916-48909061.pdf?src-supplier=Allied+Electronics, ComponentLink3URL=https://datasheet.ciiva.com/48909/70403916-48909061.pdf?src-supplier=Allied+Electronics, ComponentLink4Description=https://datasheet.ciiva.com/1787/ds-ft4232h-1787078.pdf?src-supplier=Digi-Key, ComponentLink4URL=https://datasheet.ciiva.com/1787/ds-ft4232h-1787078.pdf?src-supplier=Digi-Key, ComponentLink5Description=https://datasheet.ciiva.com/16205/ds-ft4232h-16205384.pdf?src-supplier=Future+Electronics, ComponentLink5URL=https://datasheet.ciiva.com/16205/ds-ft4232h-16205384.pdf?src-supplier=Future+Electronics, ComponentLink6Description=https://datasheet.ciiva.com/1787/ds-ft4232h-1787077.pdf?src-supplier=Digi-Key, ComponentLink6URL=https://datasheet.ciiva.com/1787/ds-ft4232h-1787077.pdf?src-supplier=Digi-Key, ComponentLink7Description=https://datasheet.ciiva.com/1787/ds-ft4232h-1787079.pdf?src-supplier=Digi-Key, ComponentLink7URL=https://datasheet.ciiva.com/1787/ds-ft4232h-1787079.pdf?src-supplier=Digi-Key, Data Rate=480Mbps, ESD Protection=Yes, Height=1.4mm, Interface=UART, Lead Free="Lead Free", Length=10.1mm, Manufacturer Part Number 1=FT4232HL-REEL, Mount="Surface Mount", Number of Channels=1, Number of Pins=64, Number of Transceivers=4, Operating Supply Voltage=3.3V, Packaging="Tape and Reel", Pricing 1="1=8,30000, 10=8,09000, 50=7,46000, 100=7,14000, 500=6,88004 (USD)", Radiation Hardening=No, RoHS=Yes, Stock 1=12423, Supplier 1=Digi-Key, Weight=0.012088oz, Width=10.1mm
U58: Manufacturer 1=STMicroelectronics, Supplier Part Number 1=497-19784-1-ND, ComponentLink1Description=Datasheet, ComponentLink1URL=https://www.st.com/resource/en/datasheet/ism330dhcx.pdf, Manufacturer Part Number 1=ISM330DHCXTR, Pricing 1="1=7,85000, 10=7,09500, 25=6,76520, 100=5,87400, 500=5,11500, 1000=4,45500 (USD)", RoHS=No, Stock 1=4928, Supplier 1=Digi-Key